# Altium PCB TELEX_BLE_RECEIVE_TYPEC_V1.0.PcbDoc
Units mil, origin at the board's own origin, x right, y up, seen from the top; angles counter-clockwise.
Board outline 652.74 x 540 mil, 2 copper layers (Top Layer, Bottom Layer); 22 components, 19 nets, 124 pads, 31 vias.
Unrouted connection lines stored in the file: 1.
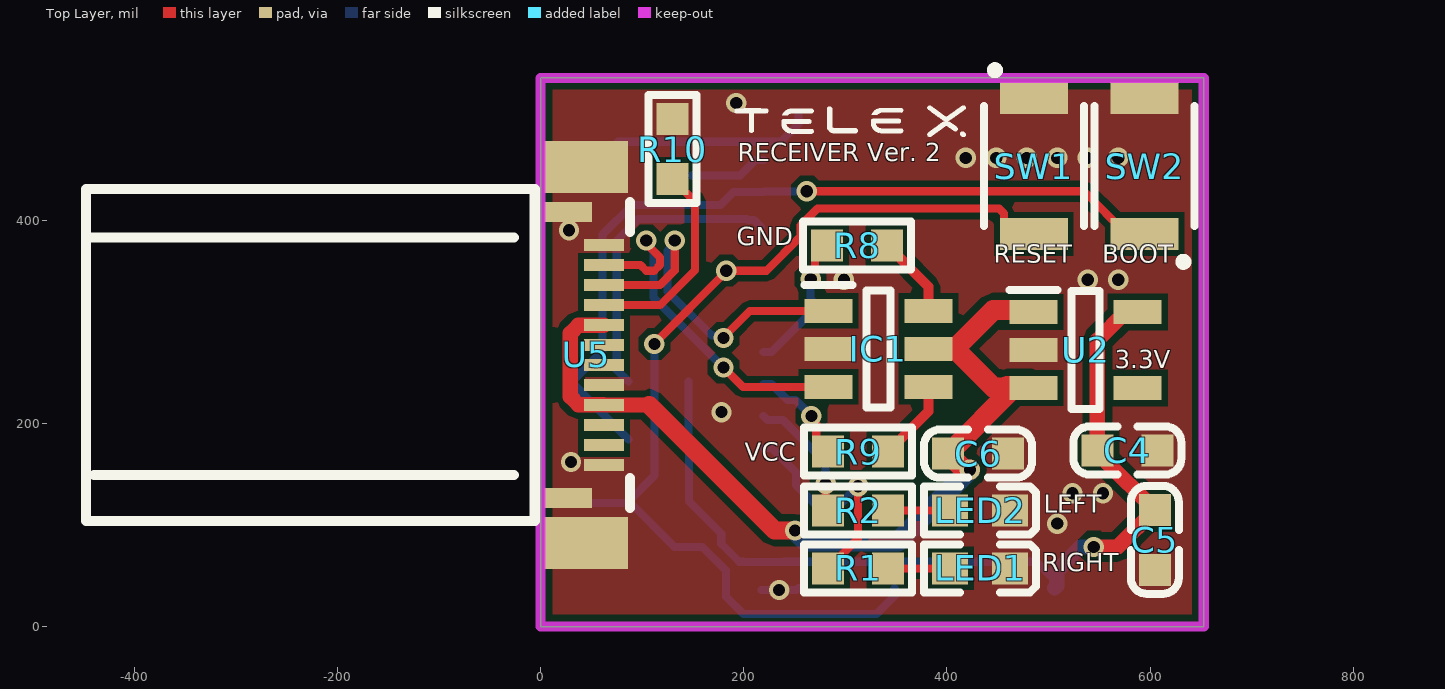
[diagram p0: Top Layer view]
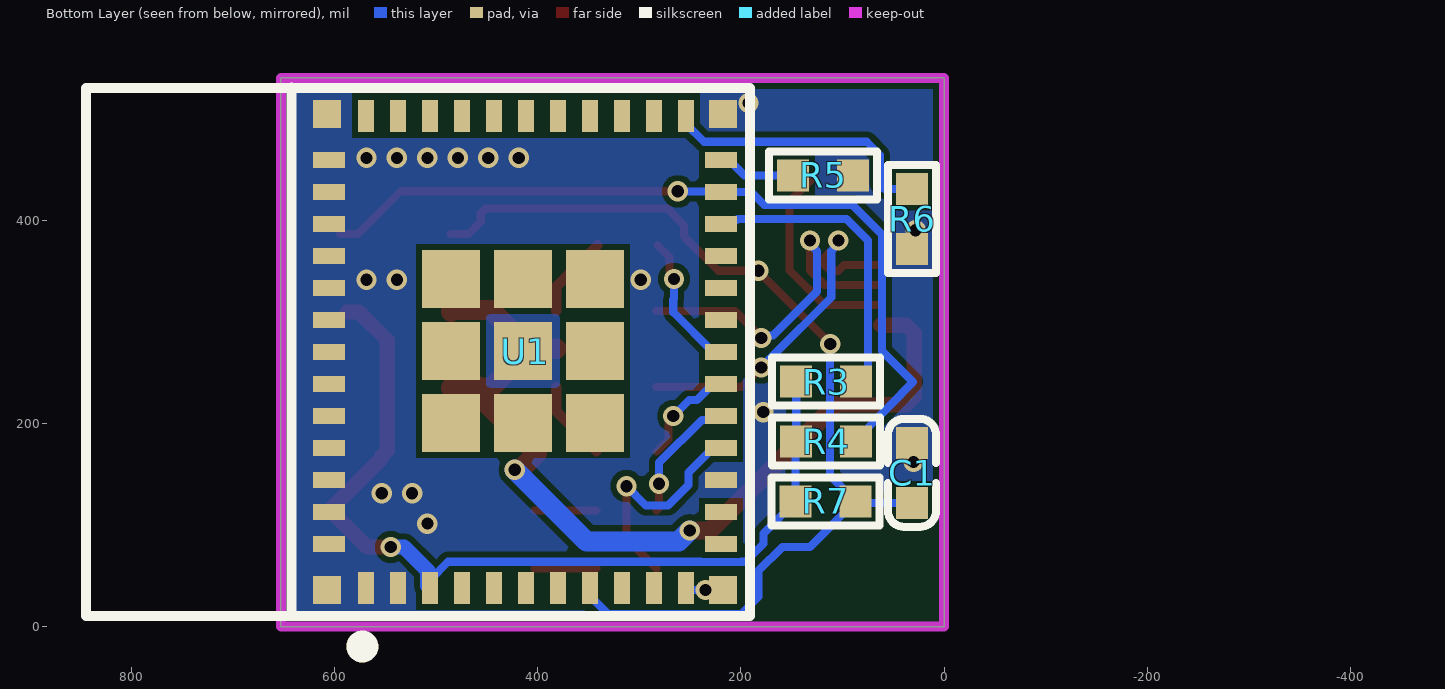
[diagram p1: Bottom Layer view, seen from below]
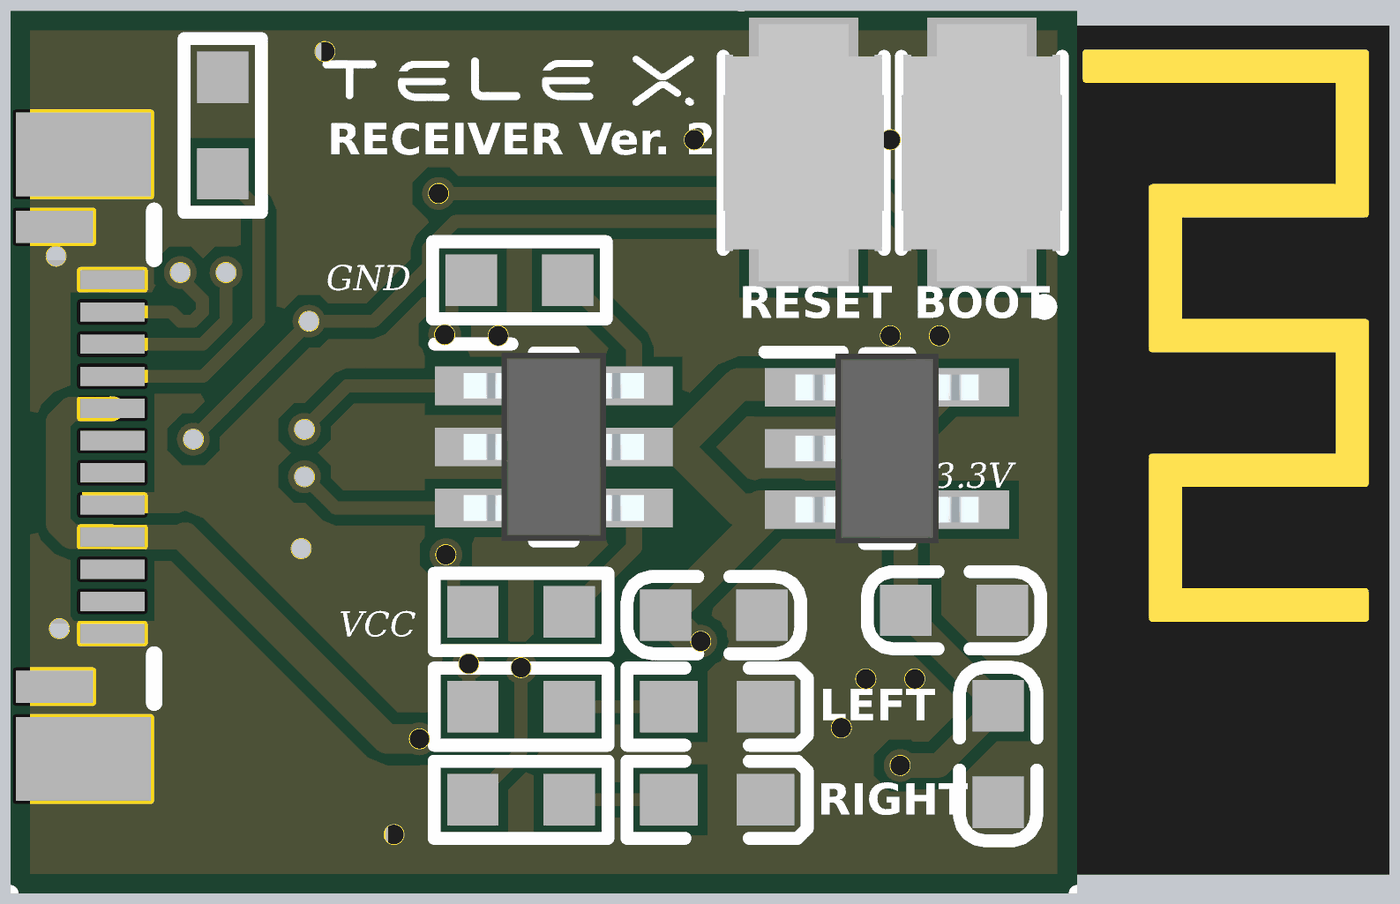
[diagram p2: 3D render of the assembled board from above, using the file's embedded part models]
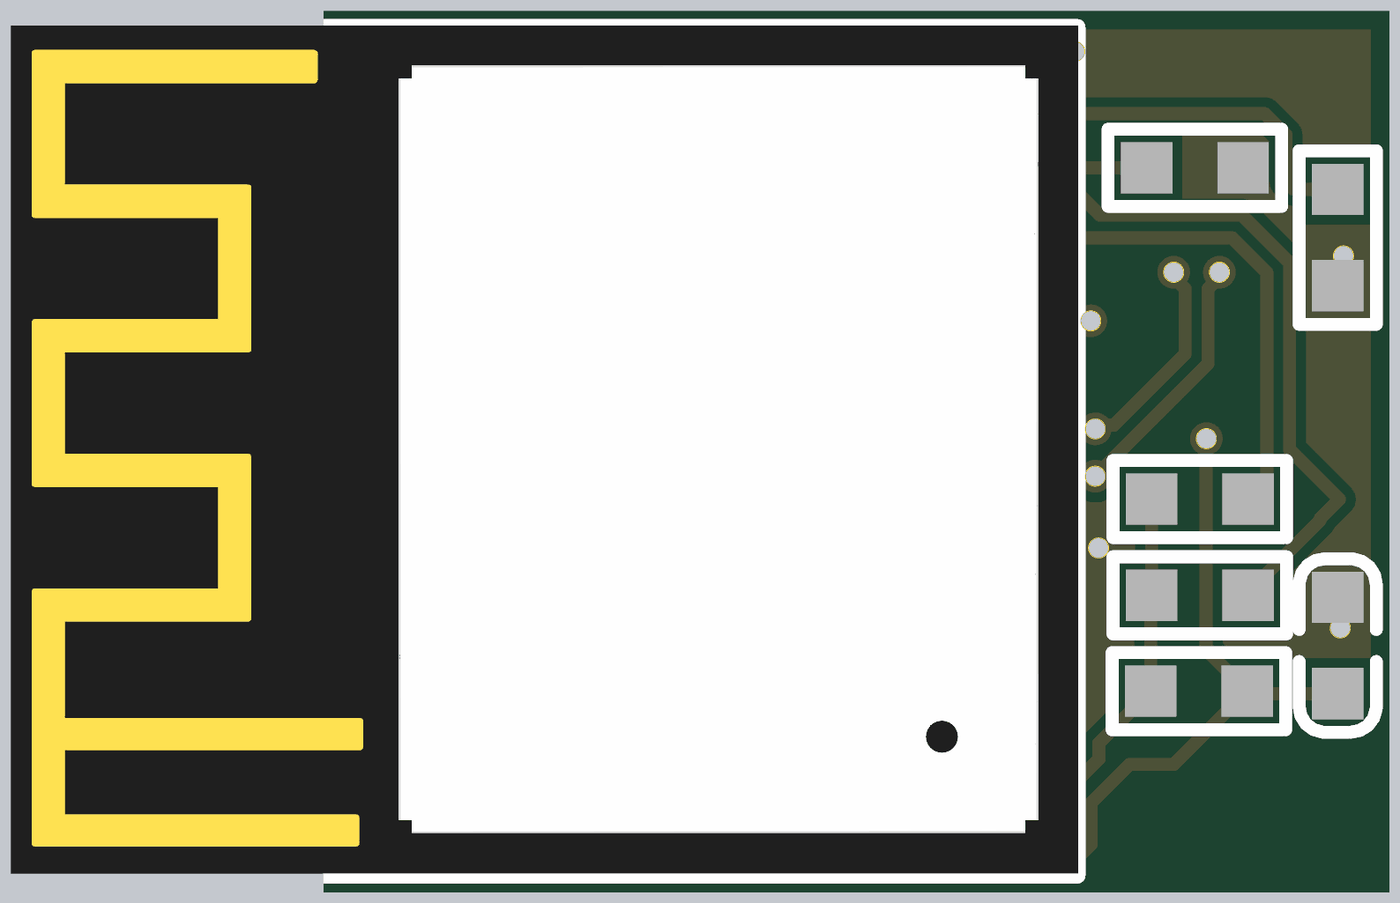
[diagram p3: 3D render of the assembled board from below, using the file's embedded part models]

## Layer stack, top to bottom
Top Solder: solder mask 0.4, Solder Resist, Dk 3.5
Top Layer: signal copper 1.4
Dielectric 1: dielectric 12.6, FR-4, Dk 4.8
Bottom Layer: signal copper 1.4
Bottom Solder: solder mask 0.4, Solder Resist, Dk 3.5

## Board outline
0,0 652.74,0 652.74,540 0,540

## Design rules (kind name [scope] priority, off if disabled: settings)
Clearance [All] p1: gap=6 ignorepadtopadclearanceinfootprint=TRUE except(0: Arc-Text Track-Text SMDPad-Text THPad-Text Via-Text Fill-Text Poly-Text Region-Text Text-Text)
DiffPairsRouting [All] p1: maxlimit=15 minlimit=6 mostfreqgap=8 toplayer_minwidth=6 toplayer_maxwidth=15 toplayer_prefwidth=8 bottomlayer_minwidth=6 bottomlayer_maxwidth=15 bottomlayer_prefwidth=8 maxuncoupledlength=500
Height [All] p1: minheight=0 maxheight=99999 prefheight=500
HoleToHoleClearance [All] p1: gap=0 allowstackedmicrovias=TRUE
MinimumSolderMaskSliver [All] p1: minsoldermaskwidth=0
PolygonConnect [All] p1: connectstyle=Direct reliefconductorwidth=10 reliefentries=4 polygonreliefangle="90 Angle" airgapwidth=10
RoutingVias [All] p1: holewidth=12 width=20 viastyle="Through Hole" minholewidth=1 minwidth=10 maxholewidth=99999 maxwidth=99999
SilkToSilkClearance [All] p1: silktosilkclearance=0
SilkToSolderMaskClearance [IsPad] p1: minsilkscreentomaskgap=0 clearancetoexposedcopper=TRUE
SolderMaskExpansion [All] p1: expansion=0 istentingtop=FALSE
SupplyNets "Schematic Supply Nets_2" [InNet('GND')] p1: voltage=0.000
SupplyNets "Schematic Supply Nets_1" [InNet('+3.3V')] p2: voltage=0.000
SupplyNets "Schematic Supply Nets" [InNet('VCC')] p3: voltage=0.000
UnRoutedNet [All] p1: checkbadconnections=TRUE
Width [All] p1: maxlimit=9999 minlimit=5 preferedwidth=8
23 further rules are at their usual default settings.

## Classes and differential pairs
differential pair PROC: +PROC_P -PROC_N
differential pair D: +D_P -D_N

## Components (designator, comment, footprint, x,y, rotation, side; value= is the part's Value field where it differs from the comment)
C1 "1uF" C0603 31.54,151.26 r90 bottom
C4 "10uF" C0603 577.54,173.26 r180 top
C5 "100nF" C0603 604.54,85.26 r90 top
C6 "10uF" C0603 430.54,170.26 r0 top
IC1 "USBLC6-2SC6" SOT95P280X145-6N 332.54,273.26 r0 top
LED1 "LED_BLUE" LED0603_BLUE 432.54,57.26 r0 top
LED2 "LED_BLUE" LED0603_BLUE 432.54,114.26 r0 top
R1 "2K" R0603 312.54,57.26 r0 top
R2 "2K" R0603 312.54,114.26 r0 top
R3 "10K" R0603 116,241 r0 bottom
R4 "10K" R0603 116,182 r180 bottom
R5 "10K" R0603 119,444 r180 bottom
R6 "10K" R0603 31.54,401.26 r270 bottom
R7 "10K" R0603 116.54,123.26 r180 bottom
R8 "22Ω" R0603 311.54,375.26 r0 top
R9 "22Ω" R0603 312.54,172.26 r0 top
R10 "5.1K" R0603 130,470 r270 top
SW1 "B3U-1000P" B3U-1000P 485.54,453.26 r90 top
SW2 "B3U-1000P" B3U-1000P 594.54,453.26 r270 top
U1 "ESP32-C6-MINI-1" ESP32-C6-MINI-1 412.45,270.26 r90 bottom
U2 "RY6050-33M5R" SOT95P285X140-5N 536.54,272.26 r0 top
U5 "TYPE-C MALE" USB-C-SMD_TYPE-C-31-G-03 44.71,267.25 r270 top

## Footprints (in the part's own frame and the unit in brackets; to place one, negate y for a bottom-side part, rotate by r counter-clockwise, add the part's x,y. Pads: shape width x height; smd on the part's side, far side on the other; paste and mask are expansions set on the pad)
B3U-1000P [mm] "两脚小龟"
  rect 0.8x1.7 smd: 1(1.7,0) 2(-1.7,0)
  silkscreen extent -1.5,-1.25 2.49,1.25, body extent -2,-1.25 2,1.25, height 1.6
C0603 [mm] "Chip Capacitor, 2-Leads, Body 1.6x0.8mm, IPC Medium Density"
  rect 0.8x0.8 smd: 1(-0.75,0) 2(0.75,0)
  silkscreen extent -1.35,-0.6 1.35,0.6, body extent -1.26,-0.4 1.26,0.4, height 0.5
ESP32-C6-MINI-1 [mm] "带天线"
  rect 0.8x0.4 smd paste+0 mask+0.05: 1(-5.9,3.975) 2(-5.9,3.175) 3(-5.9,2.375) 4(-5.9,1.575) 5(-5.9,0.775) 6(-5.9,-0.025) 7(-5.9,-0.825) 8(-5.9,-1.625) 9(-5.9,-2.425) 10(-5.9,-3.225) 11(-5.9,-4.025) 25(5.9,-4.025) 26(5.9,-3.225) 27(5.9,-2.425) 28(5.9,-1.625) 29(5.9,-0.825) 30(5.9,-0.025) 31(5.9,0.775) 32(5.9,1.575) 33(5.9,2.375) 34(5.9,3.175) 35(5.9,3.975)
  rect 0.4x0.8 smd paste+0 mask+0.05: 12(-4.8,-4.9) 13(-4,-4.9) 14(-3.2,-4.9) 15(-2.4,-4.9) 16(-1.6,-4.9) 17(-0.8,-4.9) 18(0,-4.9) 19(0.8,-4.9) 20(1.6,-4.9) 21(2.4,-4.9) 22(3.2,-4.9) 23(4,-4.9) 24(4.8,-4.9) 36(4.8,4.9) 37(4,4.9) 38(3.2,4.9) 39(2.4,4.9) 40(1.6,4.9) 41(0.8,4.9) 42(0,4.9) 43(-0.8,4.9) 44(-1.6,4.9) 45(-2.4,4.9) 46(-3.2,4.9) 47(-4,4.9) 48(-4.8,4.9)
  rect 1.45x1.45 smd paste+0 mask+0.05: 49(0.025,0.05) 49_1(-1.775,0.05) 49_2(-1.775,1.85) 49_3(0.025,1.85) 49_4(1.825,1.85) 49_5(1.825,0.05) 49_6(-1.775,-1.75) 49_7(0.025,-1.75) 49_8(1.825,-1.75)
  rect 0.7x0.7 smd paste+0 mask+0.05: 50(5.95,4.95) 51(5.95,-4.95) 52(-5.95,-4.95) 53(-5.95,4.95)
  silkscreen extent -7.57,-5.62 6.6,10.98, body extent -6.57,-5.64 6.63,10.96, height 2.46
LED0603_BLUE [mm]
  rect 0.9x0.8 smd: 1(-0.75,0) 2(0.75,0)
  silkscreen extent -1.4,-0.6 1.4,0.6, body extent -1.3,-0.41 1.3,0.41, height 0.54
R0603 [mm] "Chip Capacitor, 2-Leads, Body 1.6x0.8mm, IPC Medium Density"
  rect 0.8x0.8 smd: 1(-0.75,0) 2(0.75,0)
  silkscreen extent -1.35,-0.6 1.35,0.6, body extent -1.3,-0.4 1.3,0.4, height 0.4
SOT95P280X145-6N [mm]
  rect 1.2x0.6 smd: 1(-1.25,0.95) 2(-1.25,0) 3(-1.25,-0.95) 4(1.25,-0.95) 5(1.25,0) 6(1.25,0.95)
  silkscreen extent -1.85,-1.46 0.3,1.6, body extent -1.4,-1.46 1.4,1.46, height 1.45
SOT95P285X140-5N [mm]
  rect 1.2x0.6 smd: 1(-1.3,0.95) 2(-1.3,0) 3(-1.3,-0.95) 4(1.3,-0.95) 5(1.3,0.95)
  silkscreen extent -1.9,-1.48 0.35,1.5, body extent -1.43,-1.48 1.43,1.48, height 1.4
USB-C-SMD_TYPE-C-31-G-03 [mm]
  rect 0.5x1.2 smd paste+0 mask+0.05: 13(-3.575,-0.45) 16(3.575,-0.45)
  rect 1.3x2.1 smd paste+0 mask+0.05: 14(-4.7,0) 15(4.7,0)
  rect 0.3x1 smd paste+0 mask+0.05: A1(2.75,0.45) A2(2.25,0.45) A3(1.75,0.45) A4(1.25,0.45) A5(-1.25,0.45) A6(-1.75,0.45) A7(-2.25,0.45) A12(-2.75,0.45) B9(-0.75,0.45) B10(-0.25,0.45) B11(0.25,0.45) B12(0.75,0.45)
  silkscreen extent -4.15,-12.5 4.15,1.1

## Part data
C1 C4 C5 C6: library part CC, "瓷片电容", 品牌=muRata, 材质=X7R, 类别=电容, 精度=20%, 耐压=25V
IC1: "Integrated Circuit", Manufacturer_Name=STMicroelectronics, Mouser Part Number=511-USBLC6-2SC6, Arrow Part Number=USBLC6-2SC6, Arrow Price/Stock=https://www.arrow.com/en/products/usblc6-2sc6/stmicroelectronics.html?utm_currency=USD&region=nac, Datasheet Link=https://www.st.com/resource/en/datasheet/usblc6-2.pdf, Height=1.45mm, Manufacturer_Part_Number=USBLC6-2SC6, Mouser Price/Stock=https://www.mouser.co.uk/ProductDetail/STMicroelectronics/USBLC6-2SC6?qs=po45yt2pPpu%2FhNIlwQdTlg%3D%3D
LED1 LED2: "发光二极管（蓝）"
R1 R2 R3 R4 R5 R6 R7 R8 R9 R10: library part R, "贴片电阻", 品牌=国巨, 材质=薄膜, 类别=电阻, 精度=1%

## Via types
v1: diameter 20, hole 12, Top Layer to Bottom Layer, tented both sides, 31 vias

## Nets (pads, with @x,y where several pads share a name; then routed paths per layer and width w, separated by ;. In a path a pad name is that pad's centre, name@x,y a point inside that pad or via, vN(x,y) a via of type N, cw(c..) or ccw(c..) an arc to the next point about the centre after c; other vN are vias at no path point)
+3.3V: C4.2 C5.2 R3.2 R4.1 R7.1 U1.3 U2.5 | length 904.6
  Top Layer w15: v1(544.54,78.26) 568.02,78.26 C5.2 553.76,165.57 553.76,167.51 C4.2 548.02,281.76 575.91,309.66 U2.5
  Bottom Layer w8: R4.1 R3.2 ; R4.1@146.07,182.2 R7.1 177.8,91.54 177.8,81.47 195.54,63.72 199.34,63.72 199.65,63.41 239.43,63.41 239.75,63.72 488.08,63.72 505.95,45.84 U1.3
  Bottom Layer w15: U1.3 508.08,40.1 508.08,54.85 531.49,78.26 v1(544.54,78.26)
D_N: IC1.3 U5.A7 | length 357.4
  Top Layer w8: U5.A7 98.32,355.83 104,350.15 111.89,350.15 117.63,355.89 117.63,363.26 104,376.89 v1(104,380) ; v1(180,255) 199.14,235.86 IC1.3
  Bottom Layer w8: v1(104,380) 104,376.75 111,369.75 111,324 168.31,266.69 v1(180,255)
D_P: IC1.1 U5.A6 | length 346.9
  Top Layer w8: U5.A6 117.69,336.15 132,350.46 v1(132,380) ; v1(180,284) 180,284.75 205.91,310.66 IC1.1
  Bottom Layer w8: v1(132,380) 132,376.75 125,369.75 125,329.8 168.5,286.3 177.7,286.3 v1(180,284)
GND: C1.2 C4.1 C5.1 C6.2 IC1.2 LED1.2 LED2.2 R5.2 R6.2 R10.1 SW1.1 SW2.2 U1.1 U1.2 U1.11 U1.14 U1.36 U1.37 U1.38 U1.39 U1.40 U1.41 U1.42 U1.43 U1.44 U1.45 U1.46 U1.47 U1.48 U1.49 U1.50 U1.51 U1.52 U1.53 U2.2 U5.13 U5.14 U5.15 U5.16 U5.A1 U5.A12 U5.B12 | length 37.2
  Bottom Layer w8: U1.52 252.01,36 U1.11
  other v1: 234.79,36 508.54,101.26 523.54,131.26 553.54,131.26 30,162 178,211 298.54,341.26 538.54,341.26 568.54,341.26 28,390 418.54,461.26 448.54,461.26 478.54,461.26 508.54,461.26 538.54,461.26 568.54,461.26 192.54,515.26
NetC1_1: C1.1 R7.2 SW1.2 U1.8 | length 1013.7
  Top Layer w8: v1(112,278) 112,278.72 182.76,349.47 v1(182.76,350.19) 222.25,350.19 255.88,383.82 255.88,394.76 272.38,411.26 451.39,411.26 456.08,406.57 456.08,398.08 467.83,386.33 SW1.2
  Bottom Layer w8: C1.1 85.49,121.73 R7.2 ; v1(112,278) 112.22,277.78 112.22,148.46 R7.2 ; v1@182.76,346.94 v1(182.76,350.19) ; U1.8 348.47,30.1 330.6,12.22 199.65,12.22 182.54,29.33 182.54,54.96 159.11,78.39 131.88,78.39 R7.2
NetIC1_4: IC1.4 R9.2 | length 80
  Top Layer w10: R9.2 381.76,211.94 IC1.4
NetIC1_6: IC1.6 R8.2 | length 81.5
  Top Layer w10: R8.2 381.76,334.57 IC1.6
NetLED1_1: LED1.1 R1.2 | length 60.9
  Top Layer w8: R1.2 LED1.1
NetLED2_1: LED2.1 R2.2 | length 60.9
  Top Layer w8: R2.2 LED2.1
NetR1_1: R1.1 U1.15 | length 224.6
  Top Layer w8: R1.1 312.54,86.79 v1(312.54,138.14)
  Bottom Layer w8: U1.15 227.42,175.77 251.42,151.77 251.42,139.39 271.54,119.26 293.66,119.26 v1(312.54,138.14)
NetR2_1: R2.1 U1.16 | length 128.1
  Top Layer w8: v1(280.54,140.51) 280.54,116.73 R2.1
  Bottom Layer w8: U1.16 223.42,203.39 238.42,203.39 280.54,161.26 v1(280.54,140.51)
NetR3_1: R3.1 U1.22 | length 297.3
  Bottom Layer w8: R3.1 75,252.47 75,380 96,401 203.11,401 204,400.11 210.1,400.11 U1.22@216.76,393.45
NetR4_2: R4.2 SW2.1 U1.23 | length 806.2
  Top Layer w8: v1(262.05,428.39) 534.77,428.39 576.83,386.33 SW2.1
  Bottom Layer w8: R4.2@86.47,184 42.29,228.18 42.29,228.98 30.54,240.73 61,271.19 61,385.8 90.2,415 177,415 189.74,427.74 U1.23 219.87,428.06 261.73,428.06 v1(262.05,428.39)
NetR5_1: R5.1 U1.24 | length 77.3
  Bottom Layer w8: R5.1 196.44,444 211.67,459.23 U1.24
NetR6_1: R6.1 U1.25 | length 273.6
  Bottom Layer w8: R6.1 58.58,430.79 63.27,435.47 63.27,464.27 76.1,477.1 236.42,477.1 253.98,494.67 U1.25
NetR10_2: R10.2 U5.A5 | length 202.7
  Top Layer w8: U5.A5 117.8,316.46 152,350.66 152,418.47 R10.2
PROC_N: R9.1 U1.17 | length 101.9
  Top Layer w8: v1(266.54,207.26) 266.54,204.01 271.27,199.29 271.27,184.01 R9.1
  Bottom Layer w8: U1.17 227.42,238.76 243.14,223.03 250.77,223.03 v1(266.54,207.26)
PROC_P: R8.1 U1.18 | length 136.1
  Top Layer w8: v1(265.84,341.96) 265.84,345.21 270.27,349.64 270.27,363.51 R8.1
  Bottom Layer w8: U1.18 227.42,270.25 266.54,309.38 266.54,322.01 265.84,322.72 v1(265.84,341.96)
VCC: C6.1 IC1.5 U2.1 U2.3 U5.A4 U5.B9 | length 917.3
  Top Layer w15: U5.B9 62.15,296.5 37.15,296.5 29.24,288.59 29.24,226.22 37.15,218.31 62.16,218.31 U5.A4 106.96,218.04
  Top Layer w18: 106.96,218.04 230.45,94.55 v1(250.35,94.55)
  Top Layer w20: IC1.5 407.48,273.26 ; v1(422.54,154.26) 417.02,154.26 C6.1 U2.3@467.43,236.67 ; 459.13,234.86 445.88,234.86 407.48,273.26 ; 459.13,236.67 483.55,236.67 U2.3 ; U2.1 483.55,311.47 462.26,311.47 445.69,311.47 407.48,273.26
  Bottom Layer w20: v1(250.35,94.55) 261.19,83.72 352,83.72 v1(422.54,154.26)
pads on no net: U1.4 U1.5 U1.6 U1.7 U1.9 U1.10 U1.12 U1.13 U1.19 U1.20 U1.21 U1.26 U1.27 U1.28 U1.29 U1.30 U1.31 U1.32 U1.33 U1.34 U1.35 U1.49_1 U1.49_2 U1.49_3 U1.49_4 U1.49_5 U1.49_6 U1.49_7 U1.49_8 U2.4 U5.A2 U5.A3 U5.B10 U5.B11

## Polygon pours and split planes (outlines as drawn)
GND on Top Layer "GND_L01_P000" (solid, remove dead copper, pour order 0): 0,0 652.74,0 652.74,540 0,540
GND on Bottom Layer "GND_L02_P001" (solid, remove dead copper, pour order 1): 0,0 652.74,0 652.74,540 0,540

## Keep-outs
Keep-Out Layer:
  the board outline again, w10

## Silkscreen, mask and mechanical layers (free items; w line width, h text height)
Top Overlay:
  drawing of 9 lines, arcs and shapes, not listed
  text "RECEIVER Ver. 2" at 194,452.26 h30
  text "GND" at 193.23,369.28 h30
  text "RESET" at 446,352.26 h30
  text "BOOT" at 553,352.26 h30
  text "3.3V" at 565.02,248.28 h30
  text "VCC" at 201,157.28 h30
  text "LEFT" at 495,106 h30
  text "RIGHT" at 494,48.26 h30

## Dimensions
0,0 to 652.74,0 on Top Overlay